# Altium PCB NB3000XN.PcbDoc (part 57 of 71)
Units mil, origin at the board's own origin, x right, y up, seen from the top; angles counter-clockwise.
Board outline 9527.56 x 6929.77 mil, 6 copper layers (Top Layer, GND+SHIELD, MidLayer1, MidLayer2, P2 - 3V3+5V0, Bottom Layer), stack 62.375 mil thick; 832 components, 1027 nets, 4655 pads, 4981 vias.
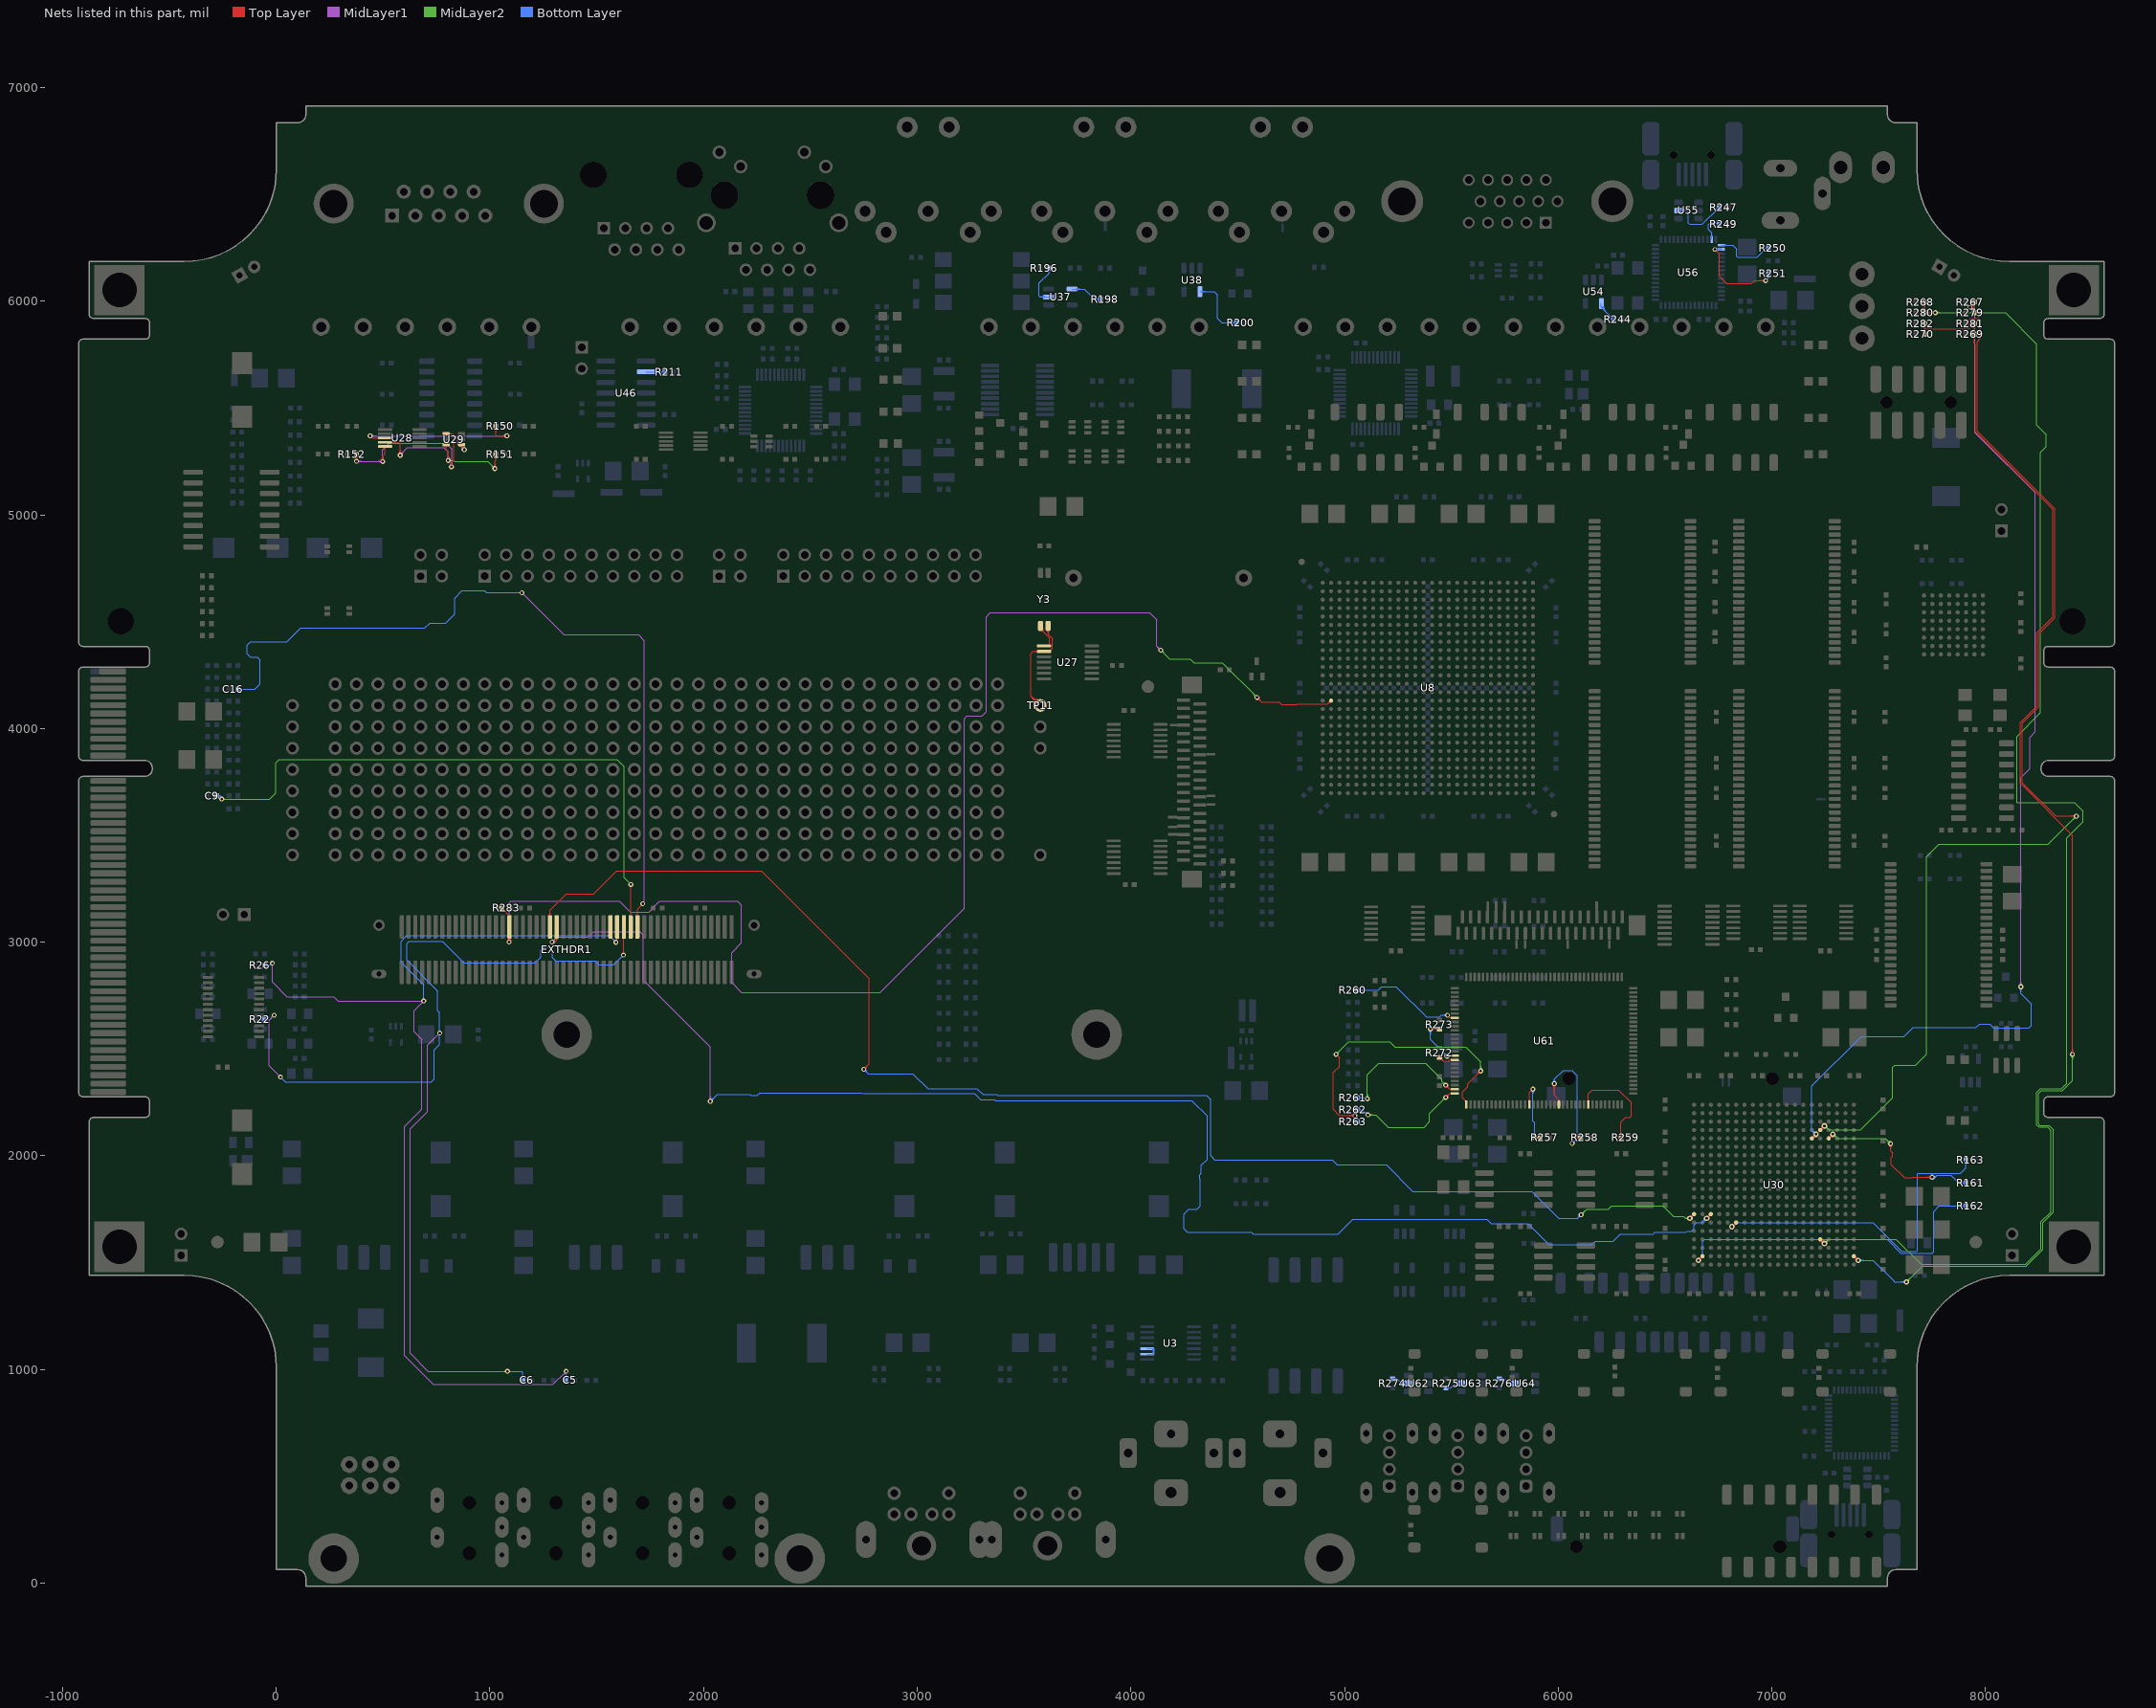
[diagram p61: the nets of this part, all layers, seen from the top]

## Via types
v1: diameter 23, hole 11.81, Top Layer to Bottom Layer, 3672 vias
v2: diameter 26, hole 11.81, Top Layer to Bottom Layer, 461 vias
v3: diameter 19, hole 11.81, Top Layer to Bottom Layer, tented both sides, 396 vias
v4: diameter 23.62, hole 11.81, Top Layer to Bottom Layer, 288 vias
v5: diameter 20, hole 11.81, Top Layer to Bottom Layer, 91 vias
v6: diameter 23, hole 11.81, Top Layer to Bottom Layer, tented both sides, 50 vias
v7: diameter 31, hole 11.81, Top Layer to Bottom Layer, 15 vias
v8: diameter 27.56, hole 11.81, Top Layer to Bottom Layer, tented both sides, 4 vias
v9: diameter 29, hole 11.81, Top Layer to Bottom Layer, 3 vias
v10: diameter 21, hole 11.81, Top Layer to Bottom Layer, 1 vias

## Nets (pads, with @x,y where several pads share a name; then routed paths per layer and width w, separated by ;. In a path a pad name is that pad's centre, name@x,y a point inside that pad or via, vN(x,y) a via of type N, cw(c..) or ccw(c..) an arc to the next point about the centre after c; other vN are vias at no path point) (continued)
NetR150_2: R150.2 U28.3 U29.4 | length 1239.4
  Top Layer w4: v4(440,5370) 450,5360 U28.3@509.29,5360 ; U28.3@479,5357.17 ccw(c472.17,5350.34) 472.17,5360 ccw(c472.17,5369.66) U28.3@479,5362.83 ; U29.4@864.34,5324.1 cw(c859.21,5317.17) 867.83,5317.17 ; U29.4@867.83,5328.82 867.83,5317.17 ; U29.4@871.33,5324.1 ccw(c876.46,5317.17) 867.83,5317.17 ; v4(880,5305) 867.83,5317.17 ; R150.2@1021.05,5407.92 cw(c1005.14,5392.01) 1027.64,5392.01 cw(c1050.14,5392.01) R150.2@1034.23,5407.92 ; R150.2@1023.88,5410.75 cw(c1014.8,5401.67) 1027.64,5401.67 cw(c1040.48,5401.67) R150.2@1031.4,5410.75 ; R150.2@1027.64,5415 1027.64,5372.36 1030,5370 v4(1080,5370) ; v4@1073.06,5363.06 ccw(c1056.31,5346.31) 1056.31,5370 ccw(c1056.31,5393.69) v4@1073.06,5376.94 ; v4@1075.89,5365.89 ccw(c1065.97,5355.97) 1065.97,5370 ccw(c1065.97,5384.03) v4@1075.89,5374.11
  MidLayer1 w4: v4(440,5370) 850,5370 ; v4@444.11,5365.89 cw(c454.03,5355.97) 454.03,5370 cw(c454.03,5384.03) v4@444.11,5374.11 ; v4@446.94,5363.06 cw(c463.69,5346.31) 463.69,5370 cw(c463.69,5393.69) v4@446.94,5376.94 ; v4@870.19,5305 ccw(c846.5,5305) 863.25,5321.75 ccw(c880,5338.5) v4@880,5314.81 ; v4@874.19,5305 ccw(c860.16,5305) 870.08,5314.92 ccw(c880,5324.84) v4@880,5310.81 ; v4(880,5305) 850,5335 850,5370 ; v4@1073.06,5363.06 ccw(c1056.31,5346.31) 1056.31,5370 ccw(c1056.31,5393.69) v4@1073.06,5376.94 ; v4@1075.89,5365.89 ccw(c1065.97,5355.97) 1065.97,5370 ccw(c1065.97,5384.03) v4@1075.89,5374.11 ; v4(1080,5370) 850,5370
NetR151_2: R151.2 U28.4 U29.3 | length 1293.9
  Top Layer w4: U28.4@509.29,5340.31 574.69,5340.31 580,5335 v4(580,5280) ; U28.4@539.58,5337.49 cw(c546.41,5330.66) 546.41,5340.31 cw(c546.41,5349.97) U28.4@539.58,5343.14 ; v4@573.06,5286.94 ccw(c556.31,5303.69) 580,5303.69 ccw(c603.69,5303.69) v4@586.94,5286.94 ; v4@575.89,5284.11 ccw(c565.97,5294.03) 580,5294.03 ccw(c594.03,5294.03) v4@584.11,5284.11 ; U29.3@790.85,5324.67 cw(c780.82,5314.64) 795,5314.64 cw(c809.18,5314.64) U29.3@799.15,5324.67 ; U29.3@795,5328.82 795,5305 805,5295 v1(805,5255) ; v1@798.28,5261.72 ccw(c782.06,5277.93) 805,5277.93 ccw(c827.93,5277.93) v1@811.72,5261.72 ; v1@801.11,5258.89 ccw(c791.72,5268.28) 805,5268.28 ccw(c818.28,5268.28) v1@808.89,5258.89 ; v1@1016.81,5223.43 ccw(c1000.59,5239.64) 1023.52,5239.64 ccw(c1046.46,5239.64) v1@1030.24,5223.43 ; v1@1019.64,5220.6 ccw(c1010.25,5229.99) 1023.52,5229.99 ccw(c1036.8,5229.99) v1@1027.41,5220.6 ; R151.2@1021.05,5277.92 cw(c1005.14,5262.01) 1027.64,5262.01 cw(c1050.13,5262.01) R151.2@1034.23,5277.92 ; v1(1023.52,5216.71) 1023.52,5250.89 1027.64,5255 R151.2@1027.64,5285 ; R151.2@1023.88,5280.75 cw(c1014.8,5271.67) 1027.64,5271.67 cw(c1040.48,5271.67) R151.2@1031.4,5280.75
  MidLayer1 w4: v4(580,5280) 615,5315 785,5315 805,5295 v1(805,5255) ; v4@580,5285.81 ccw(c580,5299.84) 589.92,5289.92 ccw(c599.84,5280) v4@585.81,5280 ; v4@580,5289.81 ccw(c580,5313.5) 596.75,5296.75 ccw(c613.5,5280) v4@589.81,5280 ; v1@798.28,5261.72 ccw(c782.06,5277.93) 805,5277.93 ccw(c827.93,5277.93) v1@811.72,5261.72 ; v1@801.11,5258.89 ccw(c791.72,5268.28) 805,5268.28 ccw(c818.28,5268.28) v1@808.89,5258.89
  MidLayer2 w4: v1(805,5255) 830,5255 835,5250 990.23,5250 v1(1023.52,5216.71) ; v1@808.89,5251.11 cw(c818.28,5241.72) 818.28,5255 cw(c818.28,5268.28) v1@808.89,5258.89 ; v1@811.72,5248.28 cw(c827.93,5232.06) 827.93,5255 cw(c827.93,5277.93) v1@811.72,5261.72 ; v1@1014.02,5216.71 ccw(c991.09,5216.71) 1007.31,5232.93 ccw(c1023.52,5249.14) v1@1023.52,5226.21 ; v1@1018.02,5216.71 ccw(c1004.75,5216.71) 1014.14,5226.1 ccw(c1023.52,5235.49) v1@1023.52,5222.21
NetR152_2: R152.2 U28.5 U29.1 | length 1361.7
  Top Layer w4: v1@368.65,5257.59 ccw(c352.43,5273.81) 375.37,5273.81 ccw(c398.3,5273.81) v1@382.08,5257.59 ; R152.2@369.59,5277.92 cw(c355.65,5263.97) 375.37,5263.97 ; v1@371.48,5254.76 ccw(c362.09,5264.15) 375.37,5264.15 ccw(c388.65,5264.15) v1@379.26,5254.76 ; v1(375.37,5250.87) 375.37,5284.19 R152.2@376.18,5285 ; v1@375.37,5260.05 cw(c400.64,5260.05) R152.2@382.77,5277.92 ; 375.37,5269.7 cw(c390.99,5269.7) R152.2@379.94,5280.75 ; v1@491.47,5256.76 ccw(c475.26,5272.98) 498.19,5272.98 ccw(c521.13,5272.98) v1@504.91,5256.76 ; v1@494.3,5253.93 ccw(c484.91,5263.32) 498.19,5263.32 ccw(c511.47,5263.32) v1@502.08,5253.93 ; v1(498.19,5250.04) 498.19,5273.9 509.29,5285 U28.5@509.29,5320.63 ; U28.5@506.46,5317.8 cw(c499.63,5310.97) 509.29,5310.97 cw(c518.95,5310.97) U28.5@512.12,5317.8 ; U29.1@795,5380 823.86,5380 831.86,5372 831.86,5255 820,5243.14 ; U29.1@808.01,5375.85 cw(c818.04,5365.82) 818.04,5380 cw(c818.04,5394.18) U29.1@808.01,5384.15 ; v4@814.63,5233.21 ccw(c808.13,5243.14) 820,5243.14 ; v4(820,5225) 820,5243.14 ; v4@825.37,5233.21 cw(c831.87,5243.14) 820,5243.14
  MidLayer1 w4: v1@373.52,5252.72 v1(375.37,5250.87) 444.11,5250.87 445.44,5249.54 498.19,5249.54 v1(498.19,5250.04) 498.19,5303.19 530,5335 795,5335 822.5,5307.5 822.5,5227.5 v4(820,5225) ; v1@379.26,5246.99 cw(c388.65,5237.6) 388.65,5250.87 cw(c388.65,5264.15) v1@379.26,5254.76 ; v1@382.08,5244.16 cw(c398.3,5227.94) 398.3,5250.87 cw(c398.3,5273.81) v1@382.08,5257.59 ; 474.05,5249.54 ccw(c474.05,5274.18) 491.47,5256.76 ccw(c475.26,5272.98) 498.19,5272.98 ccw(c521.13,5272.98) v1@504.91,5256.76 ; 476.46,5249.54 cw(c476.46,5228.31) v1@491.47,5243.32 ; 483.7,5249.54 ccw(c483.7,5264.53) 494.3,5253.93 ccw(c484.91,5263.32) 498.19,5263.32 ccw(c511.47,5263.32) v1@502.08,5253.93 ; 486.12,5249.54 cw(c486.12,5237.97) v1@494.3,5246.15 ; v4@813.06,5231.94 ccw(c790.28,5254.72) 822.5,5254.72 ; v4@815.89,5229.11 ccw(c799.94,5245.06) 822.5,5245.06 ; 822.5,5242.65 ccw(c837.65,5242.65) v4@826.94,5231.94
NetR161_2: R161.2 U30.D5 | length 1265.7
  Top Layer w4: v1@7548.81,2050.32 cw(c7532.59,2034.11) 7555.52,2034.11 cw(c7578.46,2034.11) v1@7562.24,2050.32 ; v1@7551.64,2053.15 cw(c7542.25,2043.76) 7555.52,2043.76 cw(c7568.8,2043.76) v1@7559.41,2053.15 ; v1(7555.52,2057.04) 7555.52,2023.76 7565.51,2013.78 7565.51,1999.02 7559.5,1993.02 7559.5,1959.44 7621.7,1897.24 7657.24,1897.24 7660,1900 v1(7750,1900) ; v1@7743.28,1893.28 ccw(c7727.06,1877.06) 7727.06,1900 ccw(c7727.06,1922.93) v1@7743.28,1906.72 ; v1@7746.11,1896.11 ccw(c7736.72,1886.72) 7736.72,1900 ccw(c7736.72,1913.28) v1@7746.11,1903.89
  Top Layer w8: U30.D5@7265.91,2081.54 v2(7285.59,2101.22) ; U30.D5@7265.91,2087.38 ccw(c7265.91,2101.48) 7275.88,2091.51 ccw(c7285.85,2081.54) U30.D5@7271.75,2081.54 ; v2@7276.59,2101.22 cw(c7254.86,2101.22) 7270.23,2085.86 cw(c7285.59,2070.49) v2@7285.59,2092.22
  MidLayer2 w4: v2@7285.59,2090.22 cw(c7285.59,2063.66) 7304.37,2082.44 cw(c7323.15,2101.22) v2@7296.59,2101.22 ; v2@7285.59,2094.22 cw(c7285.59,2077.32) 7297.54,2089.27 cw(c7309.49,2101.22) v2@7292.59,2101.22 ; v2(7285.59,2101.22) 7304.77,2082.04 7530.52,2082.04 v1(7555.52,2057.04) ; v1@7546.02,2057.04 ccw(c7523.09,2057.04) 7539.31,2073.26 ccw(c7555.52,2089.48) v1@7555.52,2066.54 ; v1@7550.02,2057.04 ccw(c7536.75,2057.04) 7546.14,2066.43 ccw(c7555.52,2075.82) v1@7555.52,2062.54
  Bottom Layer w4: v1@7745.93,1894.93 ccw(c7752.96,1903.69) 7760.9,1895.75 ; v1@7748.44,1898.05 ccw(c7755.77,1907.19) 7764.05,1898.91 ; v1@7750,1891.71 7756.86,1891.71 7757.57,1892.43 7773.52,1908.37 ; v1@7750,1892.18 v1(7750,1900) ; v1@7750.94,1901.17 ccw(c7758.58,1910.7) 7767.21,1902.06 ; v1@7753.44,1904.29 ccw(c7761.39,1914.2) 7770.37,1905.22 ; v1@7755.94,1907.41 ccw(c7764.2,1917.7) 7773.52,1908.37 ; R161.2@7902.23,1866.74 ccw(c7886.32,1850.84) 7886.32,1873.33 ccw(c7886.32,1895.83) R161.2@7902.23,1879.92 ; R161.2@7905.06,1869.57 ccw(c7895.98,1860.49) 7895.98,1873.33 ccw(c7895.98,1886.18) R161.2@7905.06,1877.09 ; R161.2@7908.82,1873.33 7873.52,1873.33 7838.48,1908.37 7773.52,1908.37
NetR162_2: R162.2 U30.W19 | length 1818.5
  Top Layer w8: v2(6655.67,1510.67) U30.W19@6675.35,1530.35 ; v2@6655.67,1519.67 ccw(c6655.67,1541.4) 6671.03,1526.03 ccw(c6686.4,1510.67) v2@6664.67,1510.67 ; U30.W19@6669.51,1530.35 cw(c6655.41,1530.35) 6665.38,1520.38 cw(c6675.35,1510.41) U30.W19@6675.35,1524.51
  Bottom Layer w4: v2(6655.67,1510.67) 6675.86,1530.86 6675.86,1600.04 6684.86,1609.04 7540,1609.04 7604.04,1545 7750,1545 7756.86,1551.86 7756.86,1640 ; v2@6655.67,1517.67 ccw(c6655.67,1534.57) 6667.62,1522.62 ccw(c6679.57,1510.67) v2@6662.67,1510.67 ; v2@6655.67,1521.67 ccw(c6655.67,1548.23) 6674.45,1529.45 ccw(c6693.23,1510.67) v2@6666.67,1510.67 ; 7756.86,1591.71 7756.86,1640 ; R162.2@7902.23,1758.41 ccw(c7886.32,1742.5) 7886.32,1765 ccw(c7886.32,1787.5) R162.2@7902.23,1771.59 ; R162.2@7905.06,1761.24 ccw(c7895.98,1752.16) 7895.98,1765 ccw(c7895.98,1777.84) R162.2@7905.06,1768.76 ; R162.2@7908.82,1765 7781.86,1765 7756.86,1740 7756.86,1640
NetR163_2: R163.2 U30.R15 | length 1799.5
  Top Layer w8: v2(6813.15,1668.15) U30.R15@6832.83,1687.83 ; v2@6813.15,1677.15 ccw(c6813.15,1698.88) 6828.51,1683.51 ccw(c6843.88,1668.15) v2@6822.15,1668.15 ; U30.R15@6826.99,1687.83 cw(c6812.89,1687.83) 6822.86,1677.86 cw(c6832.83,1667.89) U30.R15@6832.83,1681.99
  Bottom Layer w4: v2(6813.15,1668.15) 6832.71,1687.71 7472.65,1687.71 7607.35,1553 7678,1553 7681.86,1556.86 7681.86,1610 ; v2@6813.15,1675.15 ccw(c6813.15,1692.05) 6825.1,1680.1 ; v2@6813.15,1679.15 ccw(c6813.15,1705.71) 6831.93,1686.93 ccw(c6850.7,1668.15) v2@6824.15,1668.15 ; v2@6820.15,1668.15 cw(c6837.05,1668.15) 6825.1,1680.1 ; 7681.86,1588.71 7681.86,1610 ; R163.2@7902.23,1974.59 cw(c7886.32,1958.68) 7908.82,1958.68 cw(c7931.32,1958.68) R163.2@7915.41,1974.59 ; R163.2@7905.06,1977.41 cw(c7895.98,1968.33) 7908.82,1968.33 cw(c7921.66,1968.33) R163.2@7912.58,1977.41 ; R163.2@7908.82,1981.67 7908.82,1943.37 7883.44,1918 7683.15,1918 7681.86,1916.71 7681.86,1610
NetR196_1: R196.1 U37.2 | length 310.8
  Bottom Layer w4: U37.2@3594.16,6013.06 ccw(c3577.42,5996.31) 3577.42,6020 ccw(c3577.42,6043.69) U37.2@3594.16,6026.94 ; U37.2@3596.99,6015.89 ccw(c3587.07,6005.97) 3587.07,6020 ccw(c3587.07,6034.03) U37.2@3596.99,6024.11 ; R196.1@3609.59,6147.92 cw(c3593.68,6132.01) 3616.18,6132.01 cw(c3638.68,6132.01) R196.1@3622.77,6147.92 ; R196.1@3612.42,6150.75 cw(c3603.34,6141.67) 3616.18,6141.67 cw(c3629.02,6141.67) R196.1@3619.94,6150.75 ; U37.2@3614.88,6020 3575,6020 3570,6025 3570,6085 3616.18,6131.18 R196.1@3616.18,6155
NetR198_1: R198.1 U37.4 | length 268.1
  Bottom Layer w4: U37.4@3725.12,6057.4 3782.83,6057.4 3830.23,6010 R198.1@3858.82,6010 ; U37.4@3743.01,6053.29 cw(c3752.93,6043.37) 3752.93,6057.4 cw(c3752.93,6071.43) U37.4@3743.01,6061.51 ; U37.4@3745.84,6050.46 cw(c3762.58,6033.72) 3762.58,6057.4 cw(c3762.58,6081.09) U37.4@3745.84,6064.34 ; R198.1@3852.23,6003.41 ccw(c3836.32,5987.5) 3836.32,6010 ccw(c3836.32,6032.5) R198.1@3852.23,6016.59 ; R198.1@3855.06,6006.24 ccw(c3845.98,5997.16) 3845.98,6010 ccw(c3845.98,6022.84) R198.1@3855.06,6013.76
NetR200_1: R200.1 U38.4 | length 409.7
  Bottom Layer w4: U38.4@4323.24,6044.88 4390,6044.88 4405,6029.88 4405,5920 4425,5900 R200.1@4493.82,5900 ; U38.4@4327.35,6040.77 cw(c4337.27,6030.85) 4337.27,6044.88 cw(c4337.27,6058.91) U38.4@4327.35,6048.99 ; U38.4@4330.18,6037.94 cw(c4346.93,6021.2) 4346.93,6044.88 cw(c4346.93,6068.57) U38.4@4330.18,6051.82 ; R200.1@4487.23,5893.41 ccw(c4471.32,5877.5) 4471.32,5900 ccw(c4471.32,5922.5) R200.1@4487.23,5906.59 ; R200.1@4490.06,5896.24 ccw(c4480.98,5887.16) 4480.98,5900 ccw(c4480.98,5912.84) R200.1@4490.06,5903.76
NetR211_2: R211.2 U46.2 | length 164.7
  Bottom Layer w4: U46.2@1731.54,5670.08 1780.52,5670.08 ; U46.2@1771.41,5664.96 cw(c1780.52,5659.4) 1780.52,5670.08 ; U46.2@1771.41,5675.19 ccw(c1780.52,5680.75) 1780.52,5670.08 ; R211.2@1812.23,5663.41 ccw(c1796.32,5647.5) 1796.32,5670 ccw(c1796.32,5692.5) R211.2@1812.23,5676.59 ; R211.2@1815.06,5666.24 ccw(c1805.98,5657.16) 1805.98,5670 ccw(c1805.98,5682.84) R211.2@1815.06,5673.76 ; R211.2@1818.82,5670 1780.6,5670 1780.52,5670.08
NetR244_2: R244.2 U54.4 | length 223.2
  Bottom Layer w4: U54.4@6202.4,5966.29 cw(c6202.4,5953.92) 6211.15,5962.67 ; U54.4@6202.4,5989.88 6202.4,5971.42 R244.2@6258.82,5915 ; U54.4@6204.21,5976.1 ccw(c6219.9,5976.1) U54.4@6208.81,5965.01 ; U54.4@6208.21,5976.1 ccw(c6233.55,5976.1) 6215.63,5958.18 ; U54.4@6212.21,5976.1 ccw(c6247.21,5976.1) 6222.46,5951.36 ; 6242.07,5931.75 ccw(c6258.82,5948.5) R244.2@6258.82,5924.81 ; 6243.26,5930.56 cw(c6228.19,5915.49) R244.2@6249.5,5915.49 ; R244.2@6248.9,5924.92 ccw(c6258.82,5934.84) R244.2@6258.82,5920.81 ; R244.2@6250.09,5923.73 cw(c6241.85,5915.49) R244.2@6253.5,5915.49
NetR247_2: R247.2 U55.5 | length 413
  Bottom Layer w4: U55.5@6562.76,6425 6605,6425 6610,6420 6610,6365 6615,6360 6673.82,6360 R247.2@6753.82,6440 ; U55.5@6574.16,6419.5 cw(c6587.44,6406.22) 6587.44,6425 cw(c6587.44,6443.78) U55.5@6574.16,6430.5 ; U55.5@6576.99,6416.67 cw(c6597.1,6396.56) 6597.1,6425 cw(c6597.1,6453.44) U55.5@6576.99,6433.33 ; 6737.07,6423.25 cw(c6753.82,6406.5) R247.2@6753.82,6430.19 ; 6738.26,6424.44 ccw(c6723.19,6439.51) R247.2@6744.5,6439.51 ; R247.2@6743.9,6430.08 cw(c6753.82,6420.16) R247.2@6753.82,6434.19 ; R247.2@6745.09,6431.27 ccw(c6736.85,6439.51) R247.2@6748.5,6439.51
NetR249_2: R249.2 U56.13 | length 150.1
  Bottom Layer w4: U56.13@6715.44,6303.09 ccw(c6708.61,6309.92) 6718.27,6309.92 ccw(c6727.92,6309.92) U56.13@6721.1,6303.09 ; U56.13@6718.27,6289.33 6718.27,6320.66 6703.48,6335.44 6703.48,6358.16 6715.98,6370.66 6731.75,6370.66 6742.41,6360 R249.2@6753.82,6360
NetR250_2: R250.2 U56.15 | length 294.6
  Bottom Layer w4: U56.15@6764.33,6262.95 6817.05,6262.95 6835.69,6244.31 6835.69,6219.52 6835.69,6211.14 6839.21,6207.62 6900,6207.62 6930.79,6207.62 6973.17,6250 R250.2@6983.82,6250 ; U56.15@6778.09,6260.12 cw(c6784.92,6253.3) 6784.92,6262.95 cw(c6784.92,6272.61) U56.15@6778.09,6265.78
NetR251_2: R251.2 U56.16 | length 603.5
  Top Layer w4: v5@6733,6235.27 cw(c6733,6215.95) 6746.66,6229.61 cw(c6760.31,6243.27) v5@6741,6243.27 ; v5(6733,6243.27) 6755,6221.27 6755,6116.23 6775.37,6095.86 ; 6773.52,6097.71 6775.37,6095.86 ; v1@6964.47,6089.32 ccw(c6948.26,6073.11) 6948.26,6096.04 ccw(c6948.26,6118.98) v1@6964.47,6102.76 ; v1@6967.3,6092.15 ccw(c6957.91,6082.76) 6957.91,6096.04 ccw(c6957.91,6109.32) v1@6967.3,6099.93 ; v1(6971.19,6096.04) 6917.67,6096.04 6905,6083.37 6787.86,6083.37 6775.37,6095.86
  Bottom Layer w4: v1(6971.19,6096.04) 6983.82,6108.67 ; R251.2@6977.61,6122.56 cw(c6965.18,6108.67) 6983.82,6108.67 ; R251.2@6980.27,6125.54 cw(c6973.18,6117.61) 6983.82,6117.61 cw(c6994.46,6117.62) R251.2@6987.36,6125.54 ; R251.2@6983.82,6130 6983.82,6108.67 ; R251.2@6990.03,6122.56 ccw(c7002.46,6108.67) 6983.82,6108.67
  Bottom Layer w8: v5(6733,6243.27) U56.16@6764.33,6243.27 ; v5@6737.24,6239.03 cw(c6747.48,6228.78) 6747.48,6243.27 cw(c6747.48,6257.75) v5@6737.24,6247.51
NetR257_1: R257.1 U61.16 | length 634.5
  Top Layer w4: U61.16@5862.45,2256.02 ccw(c5855.62,2262.85) 5865.28,2262.85 ccw(c5874.93,2262.85) U61.16@5868.1,2256.02 ; U61.16@5865.27,2240 5865.27,2295.79 v1(5881.86,2312.37) ; v1@5872.36,2312.37 cw(c5849.42,2312.37) 5865.64,2296.16 cw(c5881.86,2279.94) v1@5881.86,2302.87 ; v1@5876.36,2312.37 cw(c5863.08,2312.37) 5872.47,2302.99 cw(c5881.86,2293.6) v1@5881.86,2306.87 ; v1(5890,2085) R257.1@5916.33,2085 ; v1@5893.89,2081.11 cw(c5903.28,2071.72) 5903.28,2085 cw(c5903.28,2098.28) v1@5893.89,2088.89 ; v1@5896.72,2078.28 cw(c5912.93,2062.06) 5912.93,2085 cw(c5912.93,2107.93) v1@5896.72,2091.72 ; R257.1@5909.74,2078.41 ccw(c5893.83,2062.5) 5893.83,2085 ccw(c5893.83,2107.5) R257.1@5909.74,2091.59 ; R257.1@5912.57,2081.24 ccw(c5903.49,2072.16) 5903.49,2085 ccw(c5903.49,2097.84) R257.1@5912.57,2088.76
  Bottom Layer w4: v1@5875.14,2305.66 cw(c5858.92,2289.44) 5881.86,2289.44 cw(c5904.79,2289.44) v1@5888.57,2305.66 ; v1@5877.97,2308.49 cw(c5868.58,2299.1) 5881.86,2299.1 cw(c5895.14,2299.1) v1@5885.75,2308.49 ; v1(5881.86,2312.37) 5881.86,2163.14 5890,2155 v1(5890,2085) ; v1@5883.28,2091.72 ccw(c5867.06,2107.93) 5890,2107.93 ccw(c5912.93,2107.93) v1@5896.72,2091.72 ; v1@5886.11,2088.89 ccw(c5876.72,2098.28) 5890,2098.28 ccw(c5903.28,2098.28) v1@5893.89,2088.89
NetR258_1: R258.1 U61.23 | length 934.1
  Top Layer w4: v1@5975.14,2330.99 cw(c5958.92,2314.77) 5981.86,2314.77 cw(c6004.79,2314.77) v1@5988.57,2330.99 ; v1@5977.97,2333.82 cw(c5968.58,2324.43) 5981.86,2324.43 cw(c5995.14,2324.43) v1@5985.75,2333.82 ; v1(5981.86,2337.71) 5981.86,2285.04 6003.07,2263.83 U61.23@6003.07,2240 ; U61.23@6000.24,2256.02 ccw(c5993.41,2262.85) 6003.07,2262.85 ; 6003.07,2262.85 ccw(c6012.73,2262.85) U61.23@6005.9,2256.02 ; v1@6059.01,2065.59 ccw(c6047.46,2079.04) 6065.19,2079.04 ; v1@6061.61,2062.55 ccw(c6054.93,2070.34) 6065.19,2070.34 ccw(c6075.45,2070.34) v1@6068.77,2062.55 ; v1(6065.19,2058.37) 6065.19,2079.04 ; v1@6071.38,2065.59 cw(c6082.92,2079.04) 6065.19,2079.04 ; R258.1@6098.48,2078.41 ccw(c6082.58,2062.5) 6082.58,2085 ccw(c6082.58,2107.5) R258.1@6098.48,2091.59 ; R258.1@6101.31,2081.24 ccw(c6092.23,2072.16) 6092.23,2085 ccw(c6092.23,2097.84) R258.1@6101.31,2088.76 ; R258.1@6105.07,2085 6071.15,2085 6065.19,2079.04
  Bottom Layer w4: v1@5975.67,2344.92 ccw(c5964.13,2358.37) 5981.86,2358.37 ; v1@5978.28,2341.88 ccw(c5971.59,2349.67) 5981.86,2349.67 ccw(c5992.12,2349.67) v1@5985.44,2341.88 ; v1(5981.86,2337.71) 5981.86,2358.37 ; v1@5988.04,2344.92 cw(c5999.58,2358.37) 5981.86,2358.37 ; v1(6065.19,2058.37) 6090.19,2083.37 6090.19,2375.04 6065.19,2400.04 6023.52,2400.04 5981.86,2358.37 ; v1@6065.19,2063.87 ccw(c6065.19,2077.15) 6074.58,2067.76 ccw(c6083.97,2058.37) v1@6070.69,2058.37 ; v1@6065.19,2067.87 ccw(c6065.19,2090.81) 6081.41,2074.59 ccw(c6097.63,2058.37) v1@6074.69,2058.37
NetR259_1: R259.1 U61.30 | length 550.8
  Top Layer w4: U61.30@6138.04,2256.02 ccw(c6131.21,2262.85) 6140.87,2262.85 ; U61.30@6140.86,2240 6140.87,2290.87 6158.71,2308.71 6282.86,2308.71 6342.01,2249.55 6342.01,2187.01 6335,2180 6315,2180 6293.82,2158.82 R259.1@6293.82,2085 ; 6140.87,2262.85 ccw(c6150.52,2262.85) U61.30@6143.69,2256.02 ; R259.1@6287.23,2092.08 ccw(c6271.32,2107.99) 6293.82,2107.99 ccw(c6316.32,2107.99) R259.1@6300.41,2092.08 ; R259.1@6290.06,2089.25 ccw(c6280.98,2098.33) 6293.82,2098.33 ccw(c6306.66,2098.33) R259.1@6297.58,2089.25
NetR260_1: R260.1 U61.110 | length 657.3
  Top Layer w4: v1(5481.86,2658.37) 5493.93,2646.31 U61.110@5516.83,2646.31 ; U61.110@5500.81,2643.48 ccw(c5493.98,2636.65) 5493.98,2646.31 ccw(c5493.98,2655.96) U61.110@5500.81,2649.13
  Bottom Layer w4: R260.1@5061.18,2775 5156.81,2775 5173.52,2791.71 5241.54,2791.71 5383.21,2650.04 5445,2650.04 5453.33,2658.37 v1(5481.86,2658.37) ; R260.1@5064.94,2771.24 cw(c5074.02,2762.16) 5074.02,2775 cw(c5074.02,2787.84) R260.1@5064.94,2778.76 ; R260.1@5067.77,2768.41 cw(c5083.68,2752.5) 5083.68,2775 cw(c5083.68,2797.5) R260.1@5067.77,2781.59 ; v1@5475.14,2651.66 ccw(c5458.92,2635.44) 5458.92,2658.37 ccw(c5458.92,2681.31) v1@5475.14,2665.09 ; v1@5477.97,2654.49 ccw(c5468.58,2645.1) 5468.58,2658.37 ccw(c5468.58,2671.65) v1@5477.97,2662.26
NetR261_1: R261.1 U61.127 | length 889.7
  Top Layer w4: v1@5473.52,2321.21 cw(c5473.52,2298.27) 5489.74,2314.49 cw(c5505.96,2330.71) v1@5483.02,2330.71 ; v1@5473.52,2325.21 cw(c5473.52,2311.93) 5482.91,2321.32 cw(c5492.3,2330.71) v1@5479.02,2330.71 ; v1(5473.52,2330.71) 5492.57,2311.66 U61.127@5516.83,2311.66 ; U61.127@5500.81,2308.83 ccw(c5493.98,2302) 5493.98,2311.66 ccw(c5493.98,2321.32) U61.127@5500.81,2314.49
  MidLayer2 w4: v1@5100.14,2273.43 ccw(c5083.92,2289.64) 5106.86,2289.64 ccw(c5129.79,2289.64) v1@5113.57,2273.43 ; v1@5102.97,2270.6 ccw(c5093.58,2279.99) 5106.86,2279.99 ccw(c5120.14,2279.99) v1@5110.75,2270.6 ; v1(5106.86,2266.71) 5106.86,2379.23 5161,2433.37 5210,2433.37 5379.86,2433.37 5456.52,2356.71 5456.52,2347.71 v1(5473.52,2330.71) ; v1@5464.02,2330.71 ccw(c5441.09,2330.71) 5457.31,2346.93 ccw(c5473.52,2363.14) v1@5473.52,2340.21 ; v1@5468.02,2330.71 ccw(c5454.75,2330.71) 5464.14,2340.1 ccw(c5473.52,2349.49) v1@5473.52,2336.21
  Bottom Layer w4: R261.1@5061.18,2271.82 5087.08,2271.82 5092.19,2266.71 v1(5106.86,2266.71) ; R261.1@5064.94,2268.06 cw(c5074.02,2258.98) 5074.02,2271.82 cw(c5074.02,2284.66) R261.1@5064.94,2275.58 ; R261.1@5067.77,2265.23 cw(c5083.68,2249.32) 5083.68,2271.82 cw(c5083.68,2294.32) R261.1@5067.77,2278.41
NetR262_1: R262.1 U61.128 | length 876.5
  Top Layer w4: v1(5473.52,2273.71) 5491.79,2291.98 U61.128@5516.83,2291.98 ; v1@5473.52,2279.21 ccw(c5473.52,2292.49) 5482.91,2283.1 ccw(c5492.3,2273.71) v1@5479.02,2273.71 ; v1@5473.52,2283.21 ccw(c5473.52,2306.14) 5489.74,2289.93 ccw(c5505.96,2273.71) v1@5483.02,2273.71 ; U61.128@5500.81,2289.15 ccw(c5493.98,2282.32) 5493.98,2291.98 ccw(c5493.98,2301.63) U61.128@5500.81,2294.8
  MidLayer2 w4: v1(5109.52,2191.71) 5146.86,2191.71 5205.19,2133.37 5371.9,2133.37 5398.52,2160 5398.52,2198.71 v1(5473.52,2273.71) ; v1@5113.41,2187.82 cw(c5122.8,2178.43) 5122.8,2191.71 cw(c5122.8,2204.99) v1@5113.41,2195.6 ; v1@5116.24,2184.99 cw(c5132.46,2168.77) 5132.46,2191.71 cw(c5132.46,2214.64) v1@5116.24,2198.43 ; v1@5464.02,2273.71 cw(c5441.09,2273.71) 5457.31,2257.49 cw(c5473.52,2241.27) v1@5473.52,2264.21 ; v1@5468.02,2273.71 cw(c5454.75,2273.71) 5464.14,2264.32 cw(c5473.52,2254.93) v1@5473.52,2268.21
  Bottom Layer w4: R262.1@5061.18,2215.91 5083.52,2215.91 ; R262.1@5064.96,2212.17 cw(c5073.93,2203.28) 5073.93,2215.91 cw(c5073.93,2228.54) R262.1@5064.96,2219.65 ; R262.1@5067.8,2209.35 cw(c5083.52,2193.79) 5083.52,2215.91 ; R262.1@5067.8,2222.47 ccw(c5083.52,2238.03) 5083.52,2215.91 ; v1@5100.02,2191.71 ccw(c5077.09,2191.71) 5093.31,2207.93 ccw(c5109.52,2224.14) v1@5109.52,2201.21 ; v1@5104.02,2191.71 ccw(c5090.75,2191.71) 5100.14,2201.1 ccw(c5109.52,2210.49) v1@5109.52,2197.21 ; v1(5109.52,2191.71) 5084.52,2216.71 5084.32,2216.71 5083.52,2215.91
NetR263_1: R263.1 U61.1 | length 1659.1
  Top Layer w4: v1(4960,2475) 4961.35,2475 4975.5,2460.85 4975.5,2418.43 4947.69,2390.62 4947.69,2217.31 4975,2190 5046.56,2190 v1(5048.52,2188.04) ; 5020.86,2190 cw(c5020.86,2160.38) v1@5041.81,2181.32 ; 5030.32,2190 ccw(c5030.32,2206.25) v1@5041.81,2194.76 ; 5030.52,2190 cw(c5030.52,2170.03) v1@5044.64,2184.15 ; 5562.03,2262.78 cw(c5552.44,2253.19) U61.1@5566,2253.19 ; U61.1@5565.93,2258.88 ccw(c5570,2262.94) U61.1@5570,2257.19 ; U61.1@5570,2240 5570,2254.81 5552.19,2272.62 5552.19,2299.16 5577.5,2324.47 5577.5,2337.35 v1(5637.52,2397.37) ; v1@5628.02,2397.37 cw(c5605.09,2397.37) 5621.31,2381.16 cw(c5637.52,2364.94) v1@5637.52,2387.87 ; v1@5632.02,2397.37 cw(c5618.75,2397.37) 5628.14,2387.99 cw(c5637.52,2378.6) v1@5637.52,2391.87
  MidLayer2 w4: v1(4960,2475) 5018.37,2533.37 5211.69,2533.37 5236.69,2508.37 5568.56,2508.37 5637.52,2439.41 v1(5637.52,2397.37) ; v1@4960,2480.5 ccw(c4960,2493.78) 4969.39,2484.39 ccw(c4978.78,2475) v1@4965.5,2475 ; v1@4960,2484.5 ccw(c4960,2507.43) 4976.22,2491.22 ccw(c4992.43,2475) v1@4969.5,2475 ; v1@5630.81,2404.09 ccw(c5614.59,2420.31) 5637.52,2420.31 ccw(c5660.46,2420.31) v1@5644.24,2404.09 ; v1@5633.64,2401.26 ccw(c5624.25,2410.65) 5637.52,2410.65 ccw(c5650.8,2410.65) v1@5641.41,2401.26
  Bottom Layer w4: v1(5048.52,2188.04) 5061.18,2175.38 ; R263.1@5057.11,2168.87 ccw(c5053.94,2175.38) 5061.18,2175.38 ; R263.1@5061.18,2160 5061.18,2175.38 ; R263.1@5065.26,2168.87 cw(c5068.42,2175.38) 5061.18,2175.38
NetR267_2: R267.2 R279.2 U30.F5 | length 5483.9
  Top Layer w4: v1(7927,5972) 7948,5972 ; v1@7931.13,5968.37 cw(c7939.16,5961.31) 7939.16,5972 cw(c7939.16,5982.69) v1@7931.13,5975.63 ; v1@7934.14,5965.73 cw(c7948,5953.54) 7948,5972 ; v1@7934.14,5978.27 ccw(c7948,5990.46) 7948,5972 ; R279.2@7941.58,5953.75 ccw(c7925.68,5969.66) 7948.17,5969.66 ccw(c7970.67,5969.66) R279.2@7954.76,5953.75 ; R267.2@7941.58,5989.92 cw(c7925.68,5974.01) 7948.17,5974.01 cw(c7970.67,5974.01) R267.2@7954.76,5989.92 ; R279.2@7944.41,5950.92 ccw(c7935.33,5960) 7948.17,5960 ccw(c7961.01,5960) R279.2@7951.93,5950.92 ; R267.2@7944.41,5992.75 cw(c7935.33,5983.67) 7948.17,5983.67 cw(c7961.01,5983.67) R267.2@7951.93,5992.75 ; R279.2@7948.17,5946.67 R267.2@7948.17,5997
  Top Layer w8: U30.F5@7187.17,2081.54 v2(7206.85,2101.22) ; U30.F5@7187.17,2087.38 ccw(c7187.17,2101.48) 7197.14,2091.51 ccw(c7207.11,2081.54) U30.F5@7193.01,2081.54 ; v2@7197.85,2101.22 cw(c7176.12,2101.22) 7191.49,2085.86 cw(c7206.85,2070.49) v2@7206.85,2092.22
  MidLayer1 w4: v1@7927,5962.5 cw(c7927,5939.56) 7943.22,5955.78 cw(c7959.44,5972) v1@7936.5,5972 ; v1@7927,5966.5 cw(c7927,5953.22) 7936.39,5962.61 cw(c7945.78,5972) v1@7932.5,5972 ; v1(7927,5972) 7950.81,5948.19 7950.81,5385.42 7979.95,5356.28 8232.52,5103.71 8232.52,3984.04 8207.19,3958.71 8207.19,3812.19 8165.19,3770.19 v1(8165.19,2791.71) ; v1@8158.47,2798.43 ccw(c8142.26,2814.64) 8165.19,2814.64 ccw(c8188.13,2814.64) v1@8171.91,2798.43 ; v1@8161.3,2795.6 ccw(c8151.91,2804.99) 8165.19,2804.99 ccw(c8178.47,2804.99) v1@8169.08,2795.6
  Bottom Layer w4: v2@7195.85,2101.22 ccw(c7169.3,2101.22) 7188.07,2120 ccw(c7206.85,2138.78) v2@7206.85,2112.22 ; v2@7199.85,2101.22 ccw(c7182.95,2101.22) 7194.9,2113.17 ccw(c7206.85,2125.12) v2@7206.85,2108.22 ; v2(7206.85,2101.22) 7187.52,2120.55 7187.52,2327.04 7418.86,2558.37 7618.86,2558.37 7660.52,2600.04 7955.52,2600.04 7972.19,2616.71 8020.86,2616.71 8037.86,2599.71 8203.54,2599.71 8215,2611.16 8215,2710.19 8165.19,2760 v1(8165.19,2791.71) ; v1@8158.47,2784.99 cw(c8142.26,2768.77) 8165.19,2768.77 cw(c8188.13,2768.77) v1@8171.91,2784.99 ; v1@8161.3,2787.82 cw(c8151.91,2778.43) 8165.19,2778.43 cw(c8178.47,2778.43) v1@8169.08,2787.82
NetR268_2: R268.2 R280.2 U30.E17 | length 6988.8
  Top Layer w4: R280.2@7709.59,5953.75 ccw(c7693.68,5969.66) 7716.18,5969.66 ccw(c7738.68,5969.66) 7722.77,5953.75 ccw(c7739.06,5970.04) 7739.06,5947 ; R268.2@7709.59,5989.92 cw(c7693.68,5974.01) 7716.18,5974.01 cw(c7738.68,5974.01) R268.2@7722.77,5989.92 ; R280.2@7712.42,5950.92 ccw(c7703.34,5960) 7716.18,5960 ccw(c7729.02,5960) 7719.94,5950.92 ccw(c7729.4,5960.38) 7729.4,5947 ; R268.2@7712.42,5992.75 cw(c7703.34,5983.67) 7716.18,5983.67 cw(c7729.02,5983.67) R268.2@7719.94,5992.75 ; R268.2@7716.18,5997 R280.2@7716.18,5947 ; R280.2@7719.94,5943.4 cw(c7728.64,5934.7) 7728.64,5947 ; R280.2@7721.14,5941.71 R280.2@7716.18,5946.67 R280.2@7716.18,5947 ; R280.2@7722.77,5940.57 cw(c7738.3,5925.04) 7738.3,5947 ; v1@7758.28,5940.28 ccw(c7742.06,5924.06) 7742.06,5947 ccw(c7742.06,5969.93) v1@7758.28,5953.72 ; v1@7761.11,5943.11 ccw(c7751.72,5933.72) 7751.72,5947 ccw(c7751.72,5960.28) v1@7761.11,5950.89 ; v1(7765,5947) R280.2@7716.18,5947
  Top Layer w8: U30.E17@7226.54,1603.25 cw(c7226.54,1589.15) 7236.51,1599.12 cw(c7246.48,1609.09) U30.E17@7232.38,1609.09 ; U30.E17@7226.54,1609.09 v2(7246.22,1589.41) ; v2@7237.22,1589.41 ccw(c7215.49,1589.41) 7230.86,1604.77 ccw(c7246.22,1620.14) v2@7246.22,1598.41
  MidLayer2 w4: v2(7246.22,1589.41) 7265.52,1608.71 7581.52,1608.71 7698.52,1491.71 8186.69,1491.71 8260,1565.02 8260,1690.88 8306.86,1737.73 8306.86,2118.14 8290,2135 8250.18,2135 8239.86,2145.32 8239.86,2296.73 8258.13,2315 8355,2315 8380,2340 8380,3486.87 8456.52,3563.39 8456.52,3613.48 8417,3653 8148.31,3653 8146.86,3654.46 8146.86,3963.81 8256.86,4073.81 8256.86,5291.86 8285,5320 8285,5375 8240,5420 8240,5800 8093,5947 v1(7765,5947) ; v2@7246.22,1596.41 ccw(c7246.22,1613.31) 7258.17,1601.36 ccw(c7270.12,1589.41) v2@7253.22,1589.41 ; v2@7246.22,1600.41 ccw(c7246.22,1626.97) 7265,1608.19 ; v2@7257.22,1589.41 cw(c7283.77,1589.41) 7265,1608.19 ; v1@7768.89,5943.11 cw(c7778.28,5933.72) 7778.28,5947 cw(c7778.28,5960.28) v1@7768.89,5950.89 ; v1@7771.72,5940.28 cw(c7787.94,5924.06) 7787.94,5947 cw(c7787.94,5969.93) v1@7771.72,5953.72
NetR269_2: R269.2 R281.2 U30.A19 | length 6369.9
  Top Layer w4: R269.2@7941.58,5838.92 cw(c7925.68,5823.01) 7948.17,5823.01 cw(c7970.67,5823.01) R269.2@7954.76,5838.92 ; R269.2@7941.58,5853.08 ccw(c7925.68,5868.99) 7948.17,5868.99 ccw(c7970.67,5868.99) R269.2@7954.76,5853.08 ; R281.2@7941.58,5889.25 cw(c7925.68,5873.34) 7948.17,5873.34 cw(c7970.67,5873.34) R281.2@7954.76,5889.25 ; R269.2@7944.41,5841.75 cw(c7935.33,5832.67) 7948.17,5832.67 cw(c7961.01,5832.67) R269.2@7951.93,5841.75 ; R269.2@7944.41,5850.25 ccw(c7935.33,5859.33) 7948.17,5859.33 ccw(c7961.01,5859.33) R269.2@7951.93,5850.25 ; R281.2@7944.41,5892.08 cw(c7935.33,5883) 7948.17,5883 cw(c7961.01,5883) R281.2@7951.93,5892.08 ; R281.2@7948.17,5896.33 R269.2@7948.17,5846 7948.17,5801.83 7953,5797 7953,5388.31 8315.81,5025.5 8315.81,4521.69 8240.02,4445.9 8240.02,4104.11 8164.19,4028.28 8164.19,3742.71 8173.52,3733.37 8406.86,3500.04 v1(8406.86,2475.04) ; v1@8400.14,2481.76 ccw(c8383.92,2497.98) 8406.86,2497.98 ccw(c8429.79,2497.98) v1@8413.57,2481.76 ; v1@8402.97,2478.93 ccw(c8393.58,2488.32) 8406.86,2488.32 ccw(c8420.14,2488.32) v1@8410.75,2478.93
  Top Layer w8: U30.A19@7384.02,1524.51 cw(c7384.02,1510.41) 7393.99,1520.38 cw(c7403.96,1530.35) U30.A19@7389.86,1530.35 ; U30.A19@7384.02,1530.35 v2(7403.7,1510.67) ; v2@7394.7,1510.67 ccw(c7372.97,1510.67) 7388.34,1526.03 ccw(c7403.7,1541.4) v2@7403.7,1519.67
  MidLayer2 w4: v4(7630,1410) 7703.71,1483.71 8190,1483.71 8268,1561.71 8268,1687.56 8318,1737.56 8318,2122 8297,2143 8253.49,2143 8247.86,2148.63 8247.86,2292.86 8260.94,2305.94 8360.94,2305.94 8406.86,2351.86 v1(8406.86,2475.04) ; v4@7630,1415.81 ccw(c7630,1429.84) 7639.92,1419.92 ccw(c7649.84,1410) v4@7635.81,1410 ; v4@7630,1419.81 ccw(c7630,1443.5) 7646.75,1426.75 ccw(c7663.5,1410) v4@7639.81,1410 ; v1@8400.14,2468.32 cw(c8383.92,2452.11) 8406.86,2452.11 cw(c8429.79,2452.11) v1@8413.57,2468.32 ; v1@8402.97,2471.15 cw(c8393.58,2461.76) 8406.86,2461.76 cw(c8420.14,2461.76) v1@8410.75,2471.15
  Bottom Layer w4: v2(7403.7,1510.67) 7474.33,1510.67 7569.2,1415.8 7575,1410 v4(7630,1410) ; v2@7408.65,1505.72 cw(c7420.6,1493.77) 7420.6,1510.67 cw(c7420.6,1527.57) v2@7408.65,1515.62 ; v2@7411.48,1502.89 cw(c7430.26,1484.11) 7430.26,1510.67 cw(c7430.26,1537.23) v2@7411.48,1518.45 ; v4@7623.06,1403.06 ccw(c7606.31,1386.31) 7606.31,1410 ccw(c7606.31,1433.69) v4@7623.06,1416.94 ; v4@7625.89,1405.89 ccw(c7615.97,1395.97) 7615.97,1410 ccw(c7615.97,1424.03) v4@7625.89,1414.11
NetR270_2: R270.2 R282.2 U30.E4 | length 5860.3
  Top Layer w4: R270.2@7709.59,5853.08 ccw(c7693.68,5868.99) 7716.18,5868.99 ccw(c7738.68,5868.99) R270.2@7722.77,5853.08 ; R282.2@7709.59,5889.25 cw(c7693.68,5873.34) 7716.18,5873.34 cw(c7738.68,5873.34) R282.2@7722.77,5889.25 ; R270.2@7712.42,5850.25 ccw(c7703.34,5859.33) 7716.18,5859.33 ccw(c7729.02,5859.33) R270.2@7719.94,5850.25 ; R282.2@7712.42,5892.08 cw(c7703.34,5883) 7716.18,5883 cw(c7729.02,5883) R282.2@7719.94,5892.08 ; R270.2@7716.18,5846 7716.18,5870 ; R282.2@7716.18,5896.33 7716.18,5870 ; 8401.5,3590.23 cw(c8401.5,3566.5) v1@8418.28,3583.28 ; 8402.63,3590.23 ccw(c8402.63,3612.37) v1@8418.28,3596.72 ; 8411.16,3590.23 cw(c8411.16,3576.16) v1@8421.11,3586.11 ; 8412.28,3590.23 ccw(c8412.28,3602.72) v1@8421.11,3593.89 ; v1@8423.52,3591.71 v1@8425,3590.23 ; v1(8425,3590) v1@8425,3590.23 ; 7716.18,5870 7920,5870 7925,5875 7925,5915 7930,5920 7965,5920 7975,5910 7975,5825 7961,5811 7961,5391.63 8323.81,5028.82 8323.81,4518.37 8248.02,4442.59 8248.02,4100.8 8172.19,4024.96 8172.19,3746.02 8327.98,3590.23 v1@8425,3590.23
  Top Layer w8: U30.E4@7226.54,2120.91 v2(7246.22,2140.59) ; U30.E4@7226.54,2126.75 ccw(c7226.54,2140.85) 7236.51,2130.88 ccw(c7246.48,2120.91) U30.E4@7232.38,2120.91 ; v2@7237.22,2140.59 cw(c7215.49,2140.59) 7230.86,2125.23 cw(c7246.22,2109.86) v2@7246.22,2131.59
  MidLayer2 w4: v2@7246.22,2129.59 cw(c7246.22,2103.03) 7265,2121.81 ; v2@7246.22,2133.59 cw(c7246.22,2116.69) 7258.17,2128.64 cw(c7270.12,2140.59) v2@7253.22,2140.59 ; v2(7246.22,2140.59) 7265.44,2121.37 7415.19,2121.37 7566.19,2272.37 7566.19,2415.37 7575.86,2425.04 7673.52,2425.04 7723.52,2475.04 7723.52,3400.04 7781.86,3458.37 8293.37,3458.37 v1(8425,3590) 8425,3590.23 8423.52,3591.71 v1@8423.41,3591.59 ; v2@7257.22,2140.59 ccw(c7283.77,2140.59) 7265,2121.81 ; v1@8415.5,3590 cw(c8392.56,3590) 8408.78,3573.78 cw(c8425,3557.56) v1@8425,3580.5 ; v1@8419.5,3590 cw(c8406.22,3590) 8415.61,3580.61 cw(c8425,3571.22) v1@8425,3584.5
NetR272_1: R272.1 U61.120 | length 150.4
  Top Layer w4: R272.1@5445,2461.33 5461.62,2444.71 5487.11,2444.71 5491.86,2449.46 U61.120@5516.83,2449.46 ; R272.1@5445.49,2452.01 cw(c5445.49,2430.7) 5460.56,2445.77 ; R272.1@5445.49,2456.01 cw(c5445.49,2444.36) R272.1@5453.73,2452.6 ; R272.1@5450.81,2461.24 ccw(c5464.1,2461.02) R272.1@5454.7,2451.63 ; R272.1@5454.81,2461.18 ccw(c5477.23,2460.81) 5461.37,2444.95 ; U61.120@5500.81,2446.63 ccw(c5493.98,2439.8) 5493.98,2449.46 ccw(c5493.98,2459.11) U61.120@5500.81,2452.28
NetR273_1: R273.1 U61.119 | length 534.6
  Top Layer w4: v1(5401.86,2593.71) 5401.97,2593.82 R273.1@5445,2593.82 ; v1@5405.75,2589.82 cw(c5415.4,2580.16) 5415.4,2593.82 ; v1@5405.75,2597.6 ccw(c5414.87,2606.72) 5414.87,2593.82 ; v1@5408.57,2586.99 cw(c5425.06,2570.5) 5425.06,2593.82 ; v1@5408.57,2600.43 ccw(c5424.52,2616.37) 5424.52,2593.82 ; R273.1@5437.92,2587.23 ccw(c5422.01,2571.32) 5422.01,2593.82 ccw(c5422.01,2616.32) R273.1@5437.92,2600.41 ; R273.1@5440.75,2590.06 ccw(c5431.67,2580.98) 5431.67,2593.82 ccw(c5431.67,2606.66) R273.1@5440.75,2597.58 ; v1(5480.19,2466.71) 5482.62,2469.14 U61.119@5516.83,2469.14 ; v1@5484.08,2462.82 cw(c5499.34,2447.56) U61.119@5499.34,2469.14 ; v1@5486.91,2459.99 cw(c5509,2437.9) U61.119@5509,2469.14 ; v1@5486.91,2473.43 ccw(c5497.25,2483.77) 5497.25,2469.14 ; U61.119@5500.81,2466.31 ccw(c5493.98,2459.48) 5493.98,2469.14 ccw(c5493.98,2478.8) U61.119@5500.81,2471.97
  Bottom Layer w4: v1@5395.14,2586.99 cw(c5378.92,2570.77) 5401.86,2570.77 cw(c5424.79,2570.77) v1@5408.57,2586.99 ; v1@5397.97,2589.82 cw(c5388.58,2580.43) 5401.86,2580.43 cw(c5415.14,2580.43) v1@5405.75,2589.82 ; v1(5401.86,2593.71) 5401.86,2545.04 v1(5480.19,2466.71) ; v1@5470.69,2466.71 ccw(c5447.76,2466.71) 5463.97,2482.93 ccw(c5480.19,2499.14) v1@5480.19,2476.21 ; v1@5474.69,2466.71 ccw(c5461.41,2466.71) 5470.8,2476.1 ccw(c5480.19,2485.49) v1@5480.19,2472.21
NetR274_1: R274.1 U62.5 | length 185.5
  Bottom Layer w4: R274.1@5225,956.18 5248.52,956.18 5269.71,935 ; R274.1@5229.25,952.42 cw(c5238.33,943.34) 5238.33,956.18 cw(c5238.33,969.02) R274.1@5229.25,959.94 ; R274.1@5232.08,949.59 cw(c5247.99,933.68) 5247.99,956.18 cw(c5247.99,978.68) R274.1@5232.08,962.77 ; U62.5@5282.08,928.42 ccw(c5269.71,920.07) 5269.71,935 ; U62.5@5282.08,941.58 cw(c5269.71,949.92) 5269.71,935 ; U62.5@5285.4,930.65 ccw(c5277.23,925.14) 5277.23,935 ccw(c5277.23,944.86) U62.5@5285.4,939.35 ; U62.5@5297.76,935 5269.71,935
NetR275_1: R275.1 U63.5 | length 184.2
  Bottom Layer w4: R275.1@5475,913.82 5498.82,913.82 5520,935 ; R275.1@5479.25,910.06 cw(c5488.33,900.98) 5488.33,913.82 cw(c5488.33,926.66) R275.1@5479.25,917.58 ; R275.1@5482.08,907.23 cw(c5497.99,891.32) 5497.99,913.82 cw(c5497.99,936.32) R275.1@5482.08,920.41 ; U63.5@5532.01,928.53 ccw(c5520,920.63) 5520,935 ; U63.5@5532.01,941.47 cw(c5520,949.37) 5520,935 ; U63.5@5535.35,930.72 ccw(c5527.42,925.51) 5527.42,935 ccw(c5527.42,944.49) U63.5@5535.35,939.28 ; U63.5@5547.76,935 5520,935
NetR276_1: R276.1 U64.5 | length 185.5
  Bottom Layer w4: R276.1@5725,956.18 5748.52,956.18 5769.71,935 ; R276.1@5729.25,952.42 cw(c5738.33,943.34) 5738.33,956.18 cw(c5738.33,969.02) R276.1@5729.25,959.94 ; R276.1@5732.08,949.59 cw(c5747.99,933.68) 5747.99,956.18 cw(c5747.99,978.68) R276.1@5732.08,962.77 ; U64.5@5782.08,928.42 ccw(c5769.71,920.07) 5769.71,935 ; U64.5@5782.08,941.58 cw(c5769.71,949.92) 5769.71,935 ; U64.5@5785.4,930.65 ccw(c5777.23,925.14) 5777.23,935 ccw(c5777.23,944.86) U64.5@5785.4,939.35 ; U64.5@5797.76,935 5769.71,935
NetTP11_1: TP11.1 U27.2 Y3.1 | length 881.1
  Top Layer w4: 3544.51,4139.85 ccw(c3572.77,4168.12) TP11.1@3575,4128.2 ; 3544.51,4139.85 cw(c3516.24,4111.58) TP11.1@3556.15,4109.35 ; TP11.1@3548.16,4109.8 ccw(c3492.29,4112.92) 3531.86,4152.5 ; TP11.1@3552.16,4109.57 ccw(c3504.26,4112.25) 3538.18,4146.17 ccw(c3572.1,4180.09) TP11.1@3574.78,4132.2 ; TP11.1@3560.15,4109.13 ccw(c3528.22,4110.91) 3550.83,4133.53 ccw(c3573.44,4156.14) TP11.1@3575.23,4124.21 ; U27.2@3562.76,4357.72 ccw(c3554.42,4349.38) 3554.42,4361.18 ccw(c3554.42,4372.99) U27.2@3562.76,4364.64 ; TP11.1@3574.56,4136.19 cw(c3571.43,4192.07) 3531.86,4152.5 ; TP11.1@3576.12,4108.23 3531.86,4152.5 ; Y3.1@3605.78,4462.24 cw(c3589.03,4445.49) 3612.72,4445.49 cw(c3636.4,4445.49) Y3.1@3619.65,4462.24 ; Y3.1@3608.61,4465.06 cw(c3598.69,4455.14) 3612.72,4455.14 cw(c3626.75,4455.14) Y3.1@3616.83,4465.06 ; Y3.1@3612.72,4480.98 3612.72,4442.28 3632.26,4422.74 3632.26,4377.26 3616.18,4361.18 U27.2@3592.8,4361.18 3541.86,4361.18 3531.86,4351.18 3531.86,4152.5 ; U27.2@3620.26,4361.18 cw(c3630.11,4361.18) 3623.14,4368.14 ; U27.2@3624.26,4361.18 cw(c3643.76,4361.18) 3629.97,4374.97
NetU3_9: U3.9 U3.10 | length 187.9
  Bottom Layer w4: U3.9@4076.5,1072.05 4109.02,1072.05 4109.02,1097.64 U3.10@4076.5,1097.64 ; U3.9@4100.15,1074.88 ccw(c4078.72,1096.31) 4109.02,1096.31 ; U3.10@4100.15,1094.81 cw(c4078.72,1073.38) 4109.02,1073.38 ; U3.9@4102.98,1072.05 ccw(c4088.38,1086.65) 4109.02,1086.65 ; U3.10@4102.98,1097.64 cw(c4088.38,1083.04) 4109.02,1083.04 ; U3.9@4105.8,1069.22 ccw(c4098.03,1076.99) 4109.02,1076.99 ; U3.10@4105.8,1100.47 cw(c4098.03,1092.69) 4109.02,1092.69
NetU27_1: U27.1 Y3.4 | length 216
  Top Layer w4: Y3.4@3577.28,4459.36 cw(c3577.28,4442.36) 3589.3,4454.38 ; Y3.4@3577.28,4480.98 3577.28,4466.4 3620,4423.69 3620,4395 ; Y3.4@3583.09,4469.17 ccw(c3603.81,4469.17) 3589.16,4454.52 ; Y3.4@3587.09,4469.17 ccw(c3617.47,4469.17) 3595.99,4447.7 ; U27.1@3592.8,4386.77 3611.77,4386.77 3620,4395 ; U27.1@3615.91,4390.23 ccw(c3606.04,4400.1) 3620,4400.1 ; U27.1@3617.52,4391.3 ccw(c3616,4395) 3620,4395 ; 3620,4397.06 ccw(c3629.65,4397.06) U27.1@3622.83,4390.23 ; U27.1@3622.19,4390.76 cw(c3625.19,4395) 3620,4395
ONE_WIRE_DB_PB: EXTHDR1.67 R283.2 U8.R2 | length 7046.1
  Top Layer w4: R283.2@1055.38,3150.19 cw(c1055.38,3126.5) 1072.13,3143.25 ; R283.2@1055.38,3154.19 cw(c1055.38,3140.16) R283.2@1065.3,3150.08 ; R283.2@1055.38,3160 1091.95,3123.43 EXTHDR1.67@1091.95,3071.85 1091.95,3075.04 1090.19,3075.04 v1(1090.19,3001.04) ; R283.2@1060.7,3159.5 ccw(c1072.35,3159.5) R283.2@1064.11,3151.27 ; R283.2@1064.7,3159.5 ccw(c1086.01,3159.5) 1070.94,3144.44 ; v1@1083.47,3007.76 ccw(c1067.26,3023.98) 1090.19,3023.98 ccw(c1113.13,3023.98) v1@1096.91,3007.76 ; EXTHDR1.67@1086.29,3021.07 cw(c1076.89,3011.67) v1@1090.19,3011.67 ; v1@1086.3,3004.93 ccw(c1076.91,3014.32) 1090.19,3014.32 ccw(c1103.47,3014.32) v1@1094.08,3004.93 ; v1@1090.19,3003.16 cw(c1115.52,3003.16) EXTHDR1.67@1097.61,3021.07 ; 1090.19,3012.82 cw(c1105.86,3012.82) EXTHDR1.67@1094.78,3023.9 ; 4851.26,4115.44 4854.96,4115.44 ; 4855.26,4115.44 4854.96,4115.44 ; U8.R2@4929.9,4130.94 cw(c4912.17,4130.94) 4924.71,4118.41 ; U8.R2@4937.24,4123.6 ccw(c4937.24,4105.88) 4924.71,4118.41 ; 4599.58,4136.32 cw(c4608.97,4145.71) 4595.69,4145.71 ccw(c4608.97,4145.71) 4599.58,4136.32 ; 4599.58,4136.32 ccw(c4590.19,4126.93) 4590.19,4140.21 cw(c4590.19,4126.93) 4599.58,4136.32 ; 4606.41,4129.49 cw(c4622.63,4145.71) 4599.69,4145.71 ccw(c4622.63,4145.71) 4606.41,4129.49 ; 4606.41,4129.49 ccw(c4590.19,4113.27) 4590.19,4136.21 cw(c4590.19,4113.27) 4606.41,4129.49 ; 4611.69,4124.21 4693.42,4124.21 4705.25,4112.37 4776.98,4112.37 4780.04,4115.44 4854.96,4115.44 ; 4611.69,4124.21 v1(4590.19,4145.71) 4611.69,4124.21 ; 4854.96,4115.44 4860,4115.44 4870,4115.44 4917.53,4115.44 ccw(c4917.53,4125.59) 4924.71,4118.41
  MidLayer1 w4: v1@1083.47,3007.76 ccw(c1067.26,3023.98) 1090.19,3023.98 ccw(c1113.13,3023.98) v1@1096.91,3007.76 ; v1@1086.3,3004.93 ccw(c1076.91,3014.32) 1090.19,3014.32 ccw(c1103.47,3014.32) v1@1094.08,3004.93 ; v1(1090.19,3001.04) 1090.19,3183.37 1098.52,3191.71 1606.86,3191.71 1656.86,3141.71 1745.19,3141.71 1795.19,3191.71 2158.29,3191.71 2178,3172 2178,2996.48 2131.52,2950 2131.52,2811.69 2178.09,2765.13 2826.69,2765.13 3220,3158.44 3220,4045 3233.04,4058.04 3303.04,4058.04 3323.52,4078.52 3323.52,4523.52 3342.04,4542.04 4087.96,4542.04 4120,4510 4120,4386.9 v1(4140.19,4366.71) ; v1@4130.69,4366.71 ccw(c4107.76,4366.71) 4123.97,4382.93 ccw(c4140.19,4399.14) v1@4140.19,4376.21 ; v1@4134.69,4366.71 ccw(c4121.41,4366.71) 4130.8,4376.1 ccw(c4140.19,4385.49) v1@4140.19,4372.21
  MidLayer2 w4: v1@4140.19,4357.21 cw(c4140.19,4334.27) 4156.41,4350.49 cw(c4172.63,4366.71) v1@4149.69,4366.71 ; v1@4140.19,4361.21 cw(c4140.19,4347.93) 4149.58,4357.32 cw(c4158.97,4366.71) v1@4145.69,4366.71 ; v1(4140.19,4366.71) 4181.86,4325.04 4266.86,4325.04 ; 4245,4325 4266.9,4325 ; v1@4580.69,4145.71 ccw(c4557.76,4145.71) 4573.97,4161.93 ccw(c4590.19,4178.14) v1@4590.19,4155.21 ; v1@4584.69,4145.71 ccw(c4571.41,4145.71) 4580.8,4155.1 ccw(c4590.19,4164.49) v1@4590.19,4151.21 ; v1(4590.19,4145.71) 4427.86,4308.04 4295.54,4308.04 4278.59,4325 4266.9,4325 ; 4266.86,4325.04 4266.9,4325
PB_AIN.L: C6.2 EXTHDR1.33 R22.1 | length 5282.5
  Top Layer w4: v1(1625,2940) 1627.39,2942.39 EXTHDR1.33@1627.39,3071.85
  MidLayer1 w4: v1(-9.81,2658.37) -32.5,2635.68 -32.5,2421.4 v1(20.19,2368.71) ; v1(765,2575) 708.02,2518.02 708.02,2208.02 627,2127 627,1076.18 711.48,991.71 v1(1081.86,991.71)
  Bottom Layer w4: R22.1@-53.82,2640 -28.18,2640 v1(-9.81,2658.37) ; v1(20.19,2368.71) 43.37,2345.52 725.52,2345.52 740,2360 740,2495 765.19,2520.19 v1@765.19,2574.04 ; v1@765.19,2575 765.19,2592 765.19,2670 756.02,2679.17 756.02,2772.35 611.52,2916.85 611.52,2993.82 621.52,3003.81 778.09,3003.81 877.81,2904.09 1210.91,2904.09 1238.19,2931.37 1238.19,2961.22 1254.01,2977.04 1276.37,2977.04 1292.19,2961.22 1292.19,2928.12 1308.88,2911.43 1492.97,2911.43 1509.03,2895.37 1580.37,2895.37 v1(1625,2940) ; v1(1081.86,991.71) 1148.29,991.71 1154.33,985.67 C6.2@1154.33,950
PB_AIN.MIC: EXTHDR1.37
PB_AIN.R: C5.2 EXTHDR1.35 R26.1 | length 4908.7
  Top Layer w4: v1@1593.57,3000 v1(1590,3000) 1595.89,3005.89 EXTHDR1.35@1595.89,3071.85
  MidLayer1 w4: v1(-18.14,2901.71) -18.14,2813.14 50,2745 270.04,2745 290,2725.04 v1(690.19,2725.04) 645,2679.85 645,2581.02 681.02,2545 681.02,2219.21 600,2138.18 600,1065 735,930 1295.15,930 v1(1356.86,991.71)
  Bottom Layer w4: R26.1@-53.82,2891.25 -28.6,2891.25 v1(-18.14,2901.71) ; v1(690.19,2725.04) 690.19,2800 584.52,2905.67 584.52,3005 610.33,3030.81 1559.19,3030.81 v1(1590,3000) ; C5.2@1354.32,950 v1@1354.32,989.17
PB_AOUT.L: C9.2 EXTHDR1.31 | length 2955.7
  Top Layer w4: EXTHDR1.31@1658.88,3071.85 1658.88,3189.4 1660,3190.52 v1(1660,3270) v1@1664.48,3265.52
  MidLayer2 w4: v1@-251.48,3675.04 -255,3671.52 v1(-255,3670) -30,3670 -1.27,3698.73 -1.27,3838.73 14.73,3854.73 855,3854.73 ; 790,3854.73 855,3854.73 ; v1(1660,3270) 1660.25,3270 1660.31,3270.06 1660.31,3270.59 1629.62,3301.28 1629.62,3820.5 1595.38,3854.73 855,3854.73
  Bottom Layer w4: C9.2@-279.33,3685 -261.44,3685 ; C9.2@-271.06,3679.72 cw(c-261.44,3673.59) -261.44,3685 ; C9.2@-271.06,3690.28 ccw(c-261.44,3696.41) -261.44,3685 ; v1(-255,3670) -255,3678.56 -261.43,3685
PB_AOUT.R: C16.2 EXTHDR1.29 | length 3796.2
  Top Layer w4: EXTHDR1.29@1690.38,3071.85 1690.38,3155.19 v1(1715.19,3180)
  MidLayer1 w4: v1(1149.86,4635.71) 1345.56,4440 1695,4440 1723.52,4411.48 1723.52,3188.33 v1(1715.19,3180)
  Bottom Layer w4: C16.2@-179.33,4184.09 -100,4184.09 -75,4209.09 -75,4320.04 -89.96,4335 -120,4335 -135,4350 -135,4390 -120,4405 50,4405 115.5,4470.5 695.5,4470.5 719.06,4494.06 794.06,4494.06 835,4535 835,4610 870,4645 975,4645 984.29,4635.71 v1(1149.86,4635.71)
PB_SPI.DIN: EXTHDR1.55 U30.Y14 | length 7038.9
  Top Layer w4: EXTHDR1.55@1275.27,3122.62 ccw(c1261.61,3136.28) 1280.93,3136.28 ccw(c1300.24,3136.28) EXTHDR1.55@1286.58,3122.62 ; EXTHDR1.55@1280.93,3071.85 1280.93,3149.11 1356.86,3225.04 1484.84,3225.04 1593.17,3333.37 2270.54,3333.37 2775,2828.92 2775,2430 v1(2750,2405) ; v1@2750,2410.5 ccw(c2750,2423.78) 2759.39,2414.39 ccw(c2768.78,2405) v1@2755.5,2405 ; v1@2750,2414.5 ccw(c2750,2437.43) 2766.22,2421.22 ccw(c2782.43,2405) v1@2759.5,2405
  Top Layer w8: v2(6616.3,1707.52) U30.Y14@6635.98,1727.2 ; v2@6616.3,1716.52 ccw(c6616.3,1738.25) 6631.66,1722.88 ccw(c6647.03,1707.52) v2@6625.3,1707.52 ; U30.Y14@6630.14,1727.2 cw(c6616.04,1727.2) 6626.01,1717.23 cw(c6635.98,1707.26) U30.Y14@6635.98,1721.36
  MidLayer2 w4: v1(6107.52,1724.37) 6133.19,1750.04 6234.84,1750.04 6251.5,1766.71 6490.19,1766.71 6540.52,1716.37 6585.67,1716.37 6594.52,1707.52 ; v1@6107.52,1729.87 ccw(c6107.52,1743.15) 6116.91,1733.76 ccw(c6126.3,1724.37) v1@6113.02,1724.37 ; v1@6107.52,1733.87 ccw(c6107.52,1756.81) 6123.74,1740.59 ccw(c6139.96,1724.37) v1@6117.02,1724.37 ; v2@6607.44,1700.99 ccw(c6594.53,1691.47) 6594.53,1707.52 ; v2@6607.45,1714.05 cw(c6594.52,1723.57) 6594.52,1707.52 ; v2@6610.66,1703.37 ccw(c6602.44,1697.31) 6602.44,1707.52 ccw(c6602.44,1717.73) v2@6610.66,1711.67 ; v2(6616.3,1707.52) 6594.52,1707.52
  Bottom Layer w4: v1@2750,2395.5 cw(c2750,2372.56) 2766.22,2388.78 cw(c2782.43,2405) v1@2759.5,2405 ; v1@2750,2399.5 cw(c2750,2386.22) 2759.39,2395.61 cw(c2768.78,2405) v1@2755.5,2405 ; v1(2750,2405) 2770,2385 2980,2385 3049.5,2315.5 3278.71,2315.5 3307.71,2286.5 3372.19,2286.5 3375.69,2283 3662.84,2283 3662.96,2282.87 4354.38,2282.87 4373.52,2263.73 4373.52,2000 4392.71,1980.81 4942.75,1980.81 4965.19,1958.37 5194.86,1958.37 5319.86,1833.37 5876.88,1833.37 6001.88,1708.37 6091.52,1708.37 ; v1@6098.02,1724.28 cw(c6075.83,1724.07) 6091.53,1708.38 ; v1@6102.02,1724.32 cw(c6089.18,1724.2) 6098.26,1715.11 cw(c6107.35,1706.03) v1@6107.47,1718.88 ; v1@6107.43,1714.88 ccw(c6107.22,1692.68) 6091.53,1708.38 ; v1(6107.52,1724.37) 6091.52,1708.37
PB_SPI.DOUT: EXTHDR1.53 U30.V14 | length 7393
  Top Layer w4: v1(1290.87,3000.72) 1290.19,3000.04 1304.42,3000.04 1312.42,3008.04 ; EXTHDR1.53@1306.9,3020.94 cw(c1294.6,3008.04) 1312.42,3008.04 ; EXTHDR1.53@1312.42,3071.85 1312.42,3008.04 ; EXTHDR1.53@1317.95,3020.94 ccw(c1330.25,3008.04) 1312.42,3008.04
  Top Layer w8: v2(6695.04,1707.52) U30.V14@6714.72,1727.2 ; v2@6695.04,1716.52 ccw(c6695.04,1738.25) 6710.4,1722.88 ccw(c6725.77,1707.52) v2@6704.04,1707.52 ; U30.V14@6708.88,1727.2 cw(c6694.78,1727.2) 6704.75,1717.23 cw(c6714.72,1707.26) U30.V14@6714.72,1721.36
  MidLayer1 w4: v1(1290.87,3000.72) 1315.19,3025.04 1460,3025.04 1484.96,3050 1703.31,3050 1719,3034.31 1719,2821 1735,2805 ; v1@1290.87,3006.22 ccw(c1290.87,3019.5) 1300.26,3010.11 ccw(c1309.65,3000.72) v1@1296.37,3000.72 ; v1@1290.87,3010.22 ccw(c1290.87,3033.16) 1307.09,3016.94 ccw(c1323.31,3000.72) v1@1300.37,3000.72 ; 1735.12,2805.12 2031.86,2508.37 v1(2031.86,2255) ; v1@2025.14,2261.72 ccw(c2008.92,2277.93) 2031.86,2277.93 ccw(c2054.79,2277.93) v1@2038.57,2261.72 ; v1@2027.97,2258.89 ccw(c2018.58,2268.28) 2031.86,2268.28 ccw(c2045.14,2268.28) v1@2035.75,2258.89
  Bottom Layer w4: v1(2031.86,2255) 2064.88,2288.02 2216.98,2288.02 2222.9,2282.1 2252.1,2282.1 2265,2295 2742.62,2295 2746.12,2291.5 3268.77,2291.5 3297.77,2262.5 3362.25,2262.5 3365.87,2258.87 4285,2258.87 4357.52,2186.35 4357.52,1984.12 4329.8,1956.4 4329.8,1925.35 ; v1@2031.86,2260.5 ccw(c2031.86,2273.78) 2041.25,2264.39 ccw(c2050.64,2255) v1@2037.36,2255 ; v1@2031.86,2264.5 ccw(c2031.86,2287.43) 2048.07,2271.22 ccw(c2064.29,2255) v1@2041.36,2255 ; 4265,1641.71 4565.19,1641.71 4574.19,1632.71 4969.69,1632.71 5039.98,1703 5667,1703 5686.63,1683.37 5858.19,1683.37 5958.19,1583.37 6156.86,1583.37 6173.52,1600.04 6256.86,1600.04 6290.19,1633.37 6445,1633.37 6453.33,1641.71 6598.52,1641.71 6604.86,1648.04 6625.19,1648.04 6635.52,1658.37 6635.52,1675.04 6647.67,1687.19 6674.71,1687.19 v2(6695.04,1707.52) ; 4265,1642.2 4248.86,1658.35 4248.86,1728.86 4270,1750 4310,1750 4325,1765 4325,1887.5 4323.02,1889.48 4323.02,1910.6 4330,1917.58 4330,1925.35 ; v2@6684.04,1707.52 cw(c6657.48,1707.52) 6676.26,1688.74 cw(c6695.04,1669.96) v2@6695.04,1696.52 ; v2@6688.04,1707.52 cw(c6671.14,1707.52) 6683.09,1695.57 cw(c6695.04,1683.62) v2@6695.04,1700.52